# Altium PCB Main.PcbDoc
Units mm, origin at the board's own origin, x right, y up, seen from the top; angles counter-clockwise.
Board outline 22.5 x 80 mm, 2 copper layers (Top Layer, Bottom Layer), stack 1.569 mm thick; 43 components, 44 nets, 212 pads, 109 vias.
Unrouted connection lines stored in the file: 3.
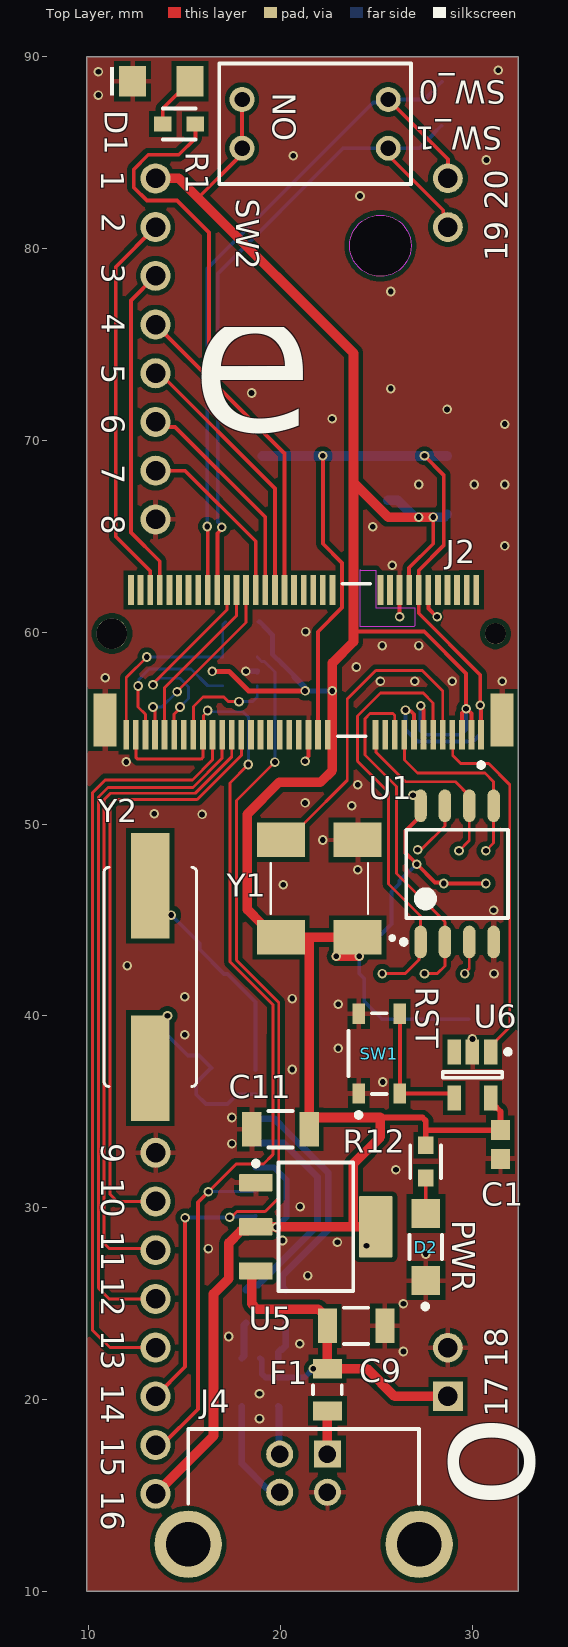
[diagram p0: Top Layer view]
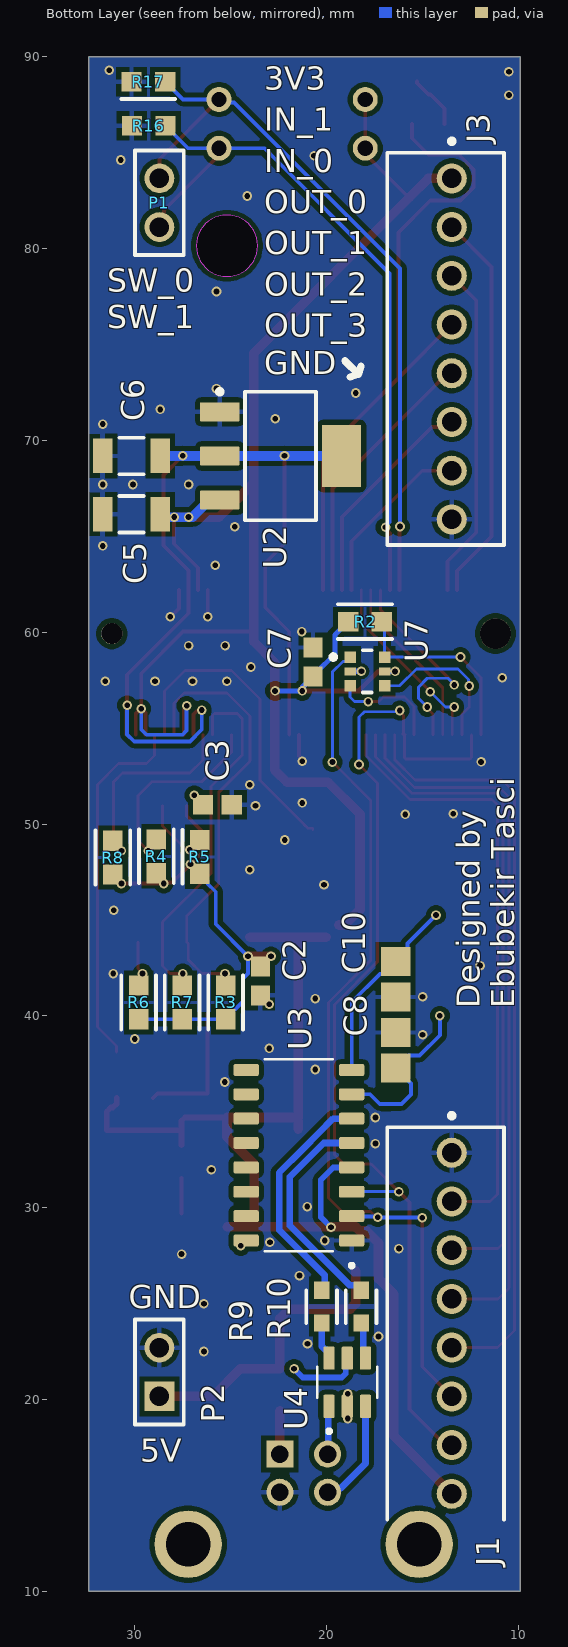
[diagram p1: Bottom Layer view, seen from below]
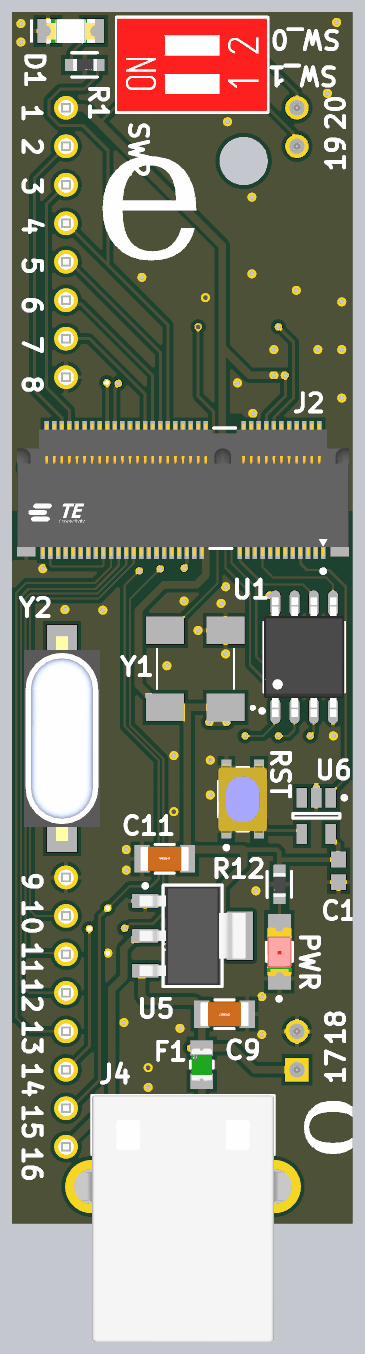
[diagram p2: 3D render of the assembled board from above, using the file's embedded part models]
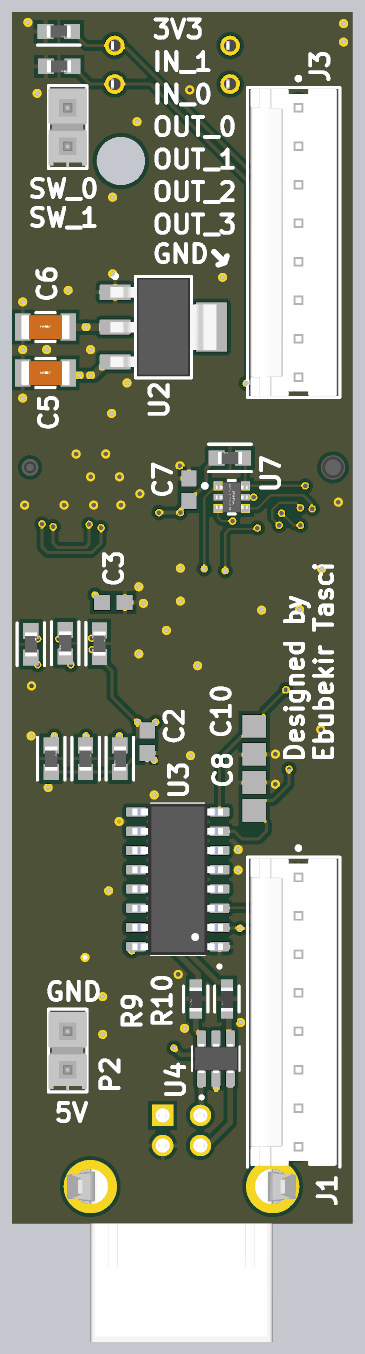
[diagram p3: 3D render of the assembled board from below, using the file's embedded part models]

## Layer stack, top to bottom
Top Solder: solder mask 0.0254, SM-001, Dk 4
Top Layer: signal copper 0.035
Dielectric 1: core 1.4986, Core-043, Dk 4.3
Bottom Layer: signal copper 0.035
Bottom Solder: solder mask 0.0254, SM-001, Dk 4

## Board outline
9.9,10 32.4,10 32.4,90 9.9,90
cut-out: 25.2,78.55 cw(c25.2,80.15) 23.6,80.15 cw(c25.2,80.15) 25.2,81.75 cw(c25.2,80.15) 26.8,80.15 cw(c25.2,80.15)

## Design rules (kind name [scope] priority, off if disabled: settings)
Clearance [All] p1: gap=0.254 ignorepadtopadclearanceinfootprint=TRUE except(0.15: Arc-Arc Arc-Track Track-Track; 0.2: Arc-SMDPad Arc-Via Arc-Hole Track-SMDPad Track-Via Track-Hole SMDPad-SMDPad)
DiffPairsRouting [All] p1: maxlimit=0.25 minlimit=0.2 mostfreqgap=0.2 toplayer_minwidth=0.25 toplayer_maxwidth=0.35 toplayer_prefwidth=0.25 bottomlayer_minwidth=0.25 bottomlayer_maxwidth=0.35 bottomlayer_prefwidth=0.25 maxuncoupledlength=5
MinimumSolderMaskSliver [All] p1: minsoldermaskwidth=0.1
PlaneConnect [All] p1: pad.planeconnectstyle=Relief pad.reliefexpansion=0.508 pad.reliefentries=4 pad.reliefconductorwidth=0.254 pad.reliefairgap=0.254 via.planeconnectstyle=Direct via.reliefexpansion=0.508 via.reliefentries=4 via.reliefconductorwidth=0.254 via.reliefairgap=0.254
PolygonConnect [All] p1: thpad.connectstyle=Relief thpad.reliefconductorwidth=0.254 thpad.reliefentries=4 thpad.polygonreliefangle="90 Angle" thpad.airgapwidth=0.254 smdpad.connectstyle=Relief smdpad.reliefconductorwidth=0.254 smdpad.reliefentries=4 smdpad.polygonreliefangle="90 Angle" smdpad.airgapwidth=0.254 via.connectstyle=Direct via.reliefconductorwidth=0.254 via.reliefentries=4 via.polygonreliefangle="90 Angle" via.airgapwidth=0.254
RoutingVias [All] p1: holewidth=0.711 width=1.27 viastyle="Through Hole" minholewidth=0.711 minwidth=1.27 maxholewidth=0.711 maxwidth=1.27
SilkToSolderMaskClearance [IsPad] p1: minsilkscreentomaskgap=0.2 clearancetoexposedcopper=TRUE
SolderMaskExpansion [All] p1: expansion=0.05 istentingtop=FALSE
SupplyNets "Schematic Supply Nets_3" [InNet('+5V_USB')] p1: voltage=0.000
SupplyNets "Schematic Supply Nets_2" [InNet('GND')] p2: voltage=0.000
SupplyNets "Schematic Supply Nets_1" [InNet('+3.3V')] p3: voltage=0.000
SupplyNets "Schematic Supply Nets" [InNet('+1.8V')] p4: voltage=0.000
Width [All] p1: maxlimit=2 minlimit=0.15 preferedwidth=0.2 minimp=50.000000 maximp=50.000000 favimp=50.000000
26 further rules are at their usual default settings.

## Classes and differential pairs
differential pair USB_1: +USB_1_P -USB_1_N
differential pair USB_2: +USB_2_P -USB_2_N

## Components (designator, comment, footprint, x,y, rotation, side; value= is the part's Value field where it differs from the comment)
C1 "100nF 0603" CAPC1608X90X35NL15T15 31.46,33.29 r90 top
C2 "100nF 0603" CAPC1608X90X35NL15T15 23.458,41.817 r90 bottom
C3 "100nF 0603" CAPC1608X90X35NL15T15 25.7,51 r0 bottom
C5 "10uF 1206" FP-CC1206-FD-MFG 30.179,66.15 r180 bottom
C6 "10uF 1206" FP-CC1206-FD-MFG 30.179,69.187 r180 bottom
C7 "100nF 0603" CAPC1608X90X35NL15T15 20.712,58.449 r270 bottom
C8 "22pF 0805" CAPC2013X145X48ML20T23 16.4,38.204 r90 bottom
C9 "10uF 1206" FP-CC1206-FD-MFG 23.937,23.833 r180 top
C10 "22pF 0805" CAPC2013X145X48ML20T23 16.4,41.908 r270 bottom
C11 "10uF 1206" FP-CC1206-FD-MFG 19.989,34.089 r0 top
D1 "LED 1206 AMBER" WL-SMCW_1206_150120xx75000 13.783,88.725 r0 top
D2 "LED 1206 RED" FP-LTST-C150KRKT-MFG 27.566,27.945 r90 top
F1 "FSMD020-0805-R" FP-0805L-MFG 22.437,20.504 r90 top value=0.15-0.85Ω
J1 "640456-8" FP-640456-8-MFG 13.797,23.97 r90 bottom
J2 "2199230-4" FP-2199230-4-MFG 21.2,58.55 r180 top
J3 "640456-8" FP-640456-8-MFG 13.797,74.77 r90 bottom
J4 "897-43-004-90-000000" FP-897-43-004-90-000000-MFG 21.2,10.3 r0 top
P1 "TSW-102-26-L-S" SMTC-TSW-102-26-XX-S#1 28.72,81.12 r90 bottom
P2 "TSW-102-26-L-S" SMTC-TSW-102-26-XX-S#2 28.72,20.16 r90 bottom
R1 "100R 0603" FP-RT0603-MFG 14.703,86.496 r0 top value=100Ω
R2 "10k 0603" FP-AC0603-IPC_A 18.002,60.547 r0 bottom
R3 "10k 0603" FP-AC0603-IPC_A 25.268,40.7 r270 bottom
R4 "10k 0603" FP-AC0603-IPC_A 28.877,48.316 r270 bottom
R5 "10k 0603" FP-AC0603-IPC_A 26.61,48.29 r90 bottom
R6 "10k 0603" FP-AC0603-IPC_A 29.8,40.7 r90 bottom
R7 "10k 0603" FP-AC0603-IPC_A 27.534,40.7 r90 bottom
R8 "10k 0603" FP-AC0603-IPC_A 31.143,48.248 r90 bottom
R9 "100R 0603" FP-RT0603-MFG 20.261,24.837 r270 bottom value=100Ω
R10 "100R 0603" FP-RT0603-MFG 18.2,24.837 r270 bottom value=100Ω
R12 "100R 0603" FP-RT0603-MFG 27.566,32.399 r270 top value=100Ω
R16 "10k 0603" FP-AC0603-IPC_A 29.277,86.4 r180 bottom
R17 "10k 0603" FP-AC0603-IPC_A 29.3,88.7 r180 bottom
SW1 "PTS810 SJG 250 SMTR LFS" FP-PTS810_SJG_250_SMTR_LF-MFG 25.14,38.03 r90 top
SW2 "418117170902" 418117170902 21.8,86.5 r90 top
U1 "MX25L3233FM2I-08G" MXIC-SOP-8_N 29.2,47.4 r90 top
U2 "TLV1117LV18DCYR" DCY0004A_M 22.4,69.187 r180 bottom
U3 "CH340G" SOIC127P600X180-16N 21.446,32.732 r0 bottom
U4 "USBLC6-2SC6" SOT95P280X145-6N 18.928,20.898 r90 bottom
U5 "TLV1117LV33DCYR" DCY0004A_N 21.834,29 r0 top
U6 "MCP1319MT-33AE/OT" SOT-23-OT5_M 30,36.92 r270 top
U7 "74LVC1G157GW,125" FP-SOT363-MFG 17.883,57.955 r180 bottom
Y1 "ASV-10.000MHZ-E-T" XTAL_ASV-10.000MHZ-E-T 22.016,46.627 r180 top
Y2 "AS-12.000-20-SMD-TR" XTAL1170X500X450 13.207,42.029 r270 top

## Footprints (in the part's own frame and the unit in brackets; to place one, negate y for a bottom-side part, rotate by r counter-clockwise, add the part's x,y. Pads: shape width x height; smd on the part's side, far side on the other; paste and mask are expansions set on the pad)
418117170902 [mm] "2.54 mm compact THT with flat actuator, 2p"
  round 1.3 hole 0.8: 1(-1.27,-3.81) 2(1.27,-3.81) 3(1.27,3.81) 4(-1.27,3.81)
  silkscreen extent -3.14,-5 3.14,5, body extent -3.04,-4.95 3.04,4.95, height 5.75
CAPC1608X90X35NL15T15 [mm] "Chip Capacitor, 2-Leads, Body 1.60x0.81mm, IPC Medium Density"
  rect 1.05x1 smd: 1(-0.75,0) 2(0.75,0)
  body extent -0.88,-0.48 0.87,0.48, height 0.9
CAPC2013X145X48ML20T23 [mm] "Chip Capacitor, 2-Leads, Body 2.00x1.25mm, IPC Low Density"
  rect 1.5x1.55 smd: 1(-0.925,0) 2(0.925,0)
  body extent -1.1,-0.72 1.1,0.72, height 1.45
DCY0004A_M [mm] "SOT223, 4-Leads, Body 6.7x3.7mm, Pitch 2.3mm, IPC Low Density"
  rrect10% 2.05x1 smd: 1(-3.175,2.3) 2(-3.175,0) 3(-3.175,-2.3)
  rrect5% 2.05x3.25 smd: 4(3.175,0)
  silkscreen extent -3.3,-3.35 1.85,3.47, body extent -3.5,-3.25 3.5,3.25, height 1.62
DCY0004A_N [mm] "SOT223, 4-Leads, Body 6.7x3.7mm, Pitch 2.3mm, IPC Medium Density"
  rrect11% 1.75x0.9 smd: 1(-3.125,2.3) 2(-3.125,0) 3(-3.125,-2.3)
  rrect6% 1.75x3.2 smd: 4(3.125,0)
  silkscreen extent -3.25,-3.35 1.95,3.42, body extent -3.5,-3.25 3.5,3.25, height 1.62
FP-0805L-MFG [mm]
  rect 1x1.5 smd paste+0 mask+0: 1(-1.1,0) 2(1.1,0)
  silkscreen extent -0.23,-0.75 0.23,0.75, body extent -1.05,-0.67 1.05,0.67, height 1.25
FP-897-43-004-90-000000-MFG [mm]
  rect 1.41x1.41 hole 0.91 paste-2539.97 mask+0: 1(1.24,6.85)
  round 1.41 hole 0.91 paste-2539.97 mask+0: 2(-1.25,6.85) 3(-1.25,4.86) 4(1.24,4.86)
  round 3.51 hole 2.31 paste-2539.97 mask+0: 5(-6.02,2.15) 6(6.02,2.15)
  silkscreen extent -6.02,4.28 6.02,8.15, body extent -7.88,-8.25 7.88,8.25, height 0.25
FP-640456-8-MFG [mil]
  round 61.65 hole 40 paste-99999 mask+0: 1(350,-12.5) 2(250,-12.5) 3(150,-12.5) 4(50,-12.5) 5(-50,-12.5) 6(-150,-12.5) 7(-250,-12.5) 8(-350,-12.5)
  silkscreen extent -403,-120 431,120, body extent -400,-113 400,113, height 415
FP-2199230-4-MFG [mm]
  rect 0.3x1.55 smd paste+0 mask+0: 1(-9.25,3.9) 2(-9,-3.65) 3(-8.75,3.9) 4(-8.5,-3.65) 5(-8.25,3.9) 6(-8,-3.65) 7(-7.75,3.9) 8(-7.5,-3.65) 9(-7.25,3.9) 10(-7,-3.65) 11(-6.75,3.9) 12(-6.5,-3.65) 13(-6.25,3.9) 14(-6,-3.65) 15(-5.75,3.9) 16(-5.5,-3.65) 17(-5.25,3.9) 18(-5,-3.65) 19(-4.75,3.9) 20(-4.5,-3.65) 21(-4.25,3.9) 22(-4,-3.65) 23(-3.75,3.9) 32(-1.5,-3.65) 33(-1.25,3.9) 34(-1,-3.65) 35(-0.75,3.9) 36(-0.5,-3.65) 37(-0.25,3.9) 38(0,-3.65) 39(0.25,3.9) 40(0.5,-3.65) 41(0.75,3.9) 42(1,-3.65) 43(1.25,3.9) 44(1.5,-3.65) 45(1.75,3.9) 46(2,-3.65) 47(2.25,3.9) 48(2.5,-3.65) 49(2.75,3.9) 50(3,-3.65) 51(3.25,3.9) 52(3.5,-3.65) 53(3.75,3.9) 54(4,-3.65) 55(4.25,3.9) 56(4.5,-3.65) 57(4.75,3.9) 58(5,-3.65) 59(5.25,3.9) 60(5.5,-3.65) 61(5.75,3.9) 62(6,-3.65) 63(6.25,3.9) 64(6.5,-3.65) 65(6.75,3.9) 66(7,-3.65) 67(7.25,3.9) 68(7.5,-3.65) 69(7.75,3.9) 70(8,-3.65) 71(8.25,3.9) 72(8.5,-3.65) 73(8.75,3.9) 74(9,-3.65) 75(9.25,3.9)
  rect 1.2x2.75 smd paste+0 mask+0: 76(-10.35,3.125) 77(10.35,3.125)
  round 1.1 hole 1.1 unplated paste-2539.97 mask+0: ""(-10,-1.375)
  round 1.6 hole 1.6 unplated paste-2539.97 mask+0: ""(10,-1.375)
  silkscreen extent -9.38,-3.98 -1.78,5.6, body extent -11.1,-4.52 11.1,4.77, height 0.25
FP-AC0603-IPC_A [mm]
  rect 1.059x1.012 smd paste+0 mask+0: 1(-0.877,0) 2(0.877,0)
  silkscreen extent -1.41,-0.91 1.41,0.91, body extent -0.8,-0.4 0.8,0.4, height 0.55
FP-CC1206-FD-MFG [mm]
  rect 1x1.8 smd paste+0 mask+0: 1(-1.5,0) 2(1.5,0)
  silkscreen extent -0.63,-0.95 0.63,0.95, body extent -1.6,-0.8 1.6,0.8, height 1.9
FP-LTST-C150KRKT-MFG [mm]
  rect 1.5x1.5 smd paste+0 mask+0: 1(-1.75,0) 2(1.75,0)
  silkscreen extent -3.22,-0.85 0.63,0.85, body extent -2.6,-0.95 2.6,0.95, height 0.25
FP-PTS810_SJG_250_SMTR_LF-MFG [mm]
  rect 1.05x0.65 smd paste+0 mask+0: 1(-2.075,1.075) 2(2.075,1.075) 3(-2.075,-1.075) 4(2.075,-1.075)
  silkscreen extent -3.32,-0.38 2.1,1.6, body extent -2.7,-1.7 2.7,1.7, height 0.25
FP-RT0603-MFG [mm]
  rect 0.9x0.8 smd paste+0 mask+0: 1(-0.85,0) 2(0.85,0)
  silkscreen extent -0.85,-0.81 0.86,0.8, body extent -1.4,-0.55 1.4,0.55, height 0.25
FP-SOT363-MFG [mm]
  rect 0.6x0.6 smd paste-1000 mask+0: 1(-0.9,0.75) 3(-0.9,-0.75) 4(0.9,-0.75) 6(0.9,0.75)
  rect 0.6x0.4 smd paste+0 mask+0: 2(-0.9,0) 5(0.9,0)
  silkscreen extent -1.9,-1.1 0.23,1.1, body extent -1.05,-1 1.05,1, height 1.1
MXIC-SOP-8_N [mm] "SOP, 8-Leads, Body 5.4x5.3mm, Pitch 1.27mm, IPC Medium Density"
  oval 1.7x0.65 smd: 1(-3.55,1.905) 2(-3.55,0.635) 3(-3.55,-0.635) 4(-3.55,-1.905) 5(3.55,-1.905) 6(3.55,-0.635) 7(3.55,0.635) 8(3.55,1.905)
  silkscreen extent -3.67,-2.65 2.3,2.9, body extent -3.95,-2.65 3.95,2.65, height 2.16
SMTC-TSW-102-26-XX-S#1 [mm] ".025 SQ Post Terminal Strip Assembly, 1x2 Pins, Vertical, 2.54mm Pitch, Male"
  round 1.55 hole 1.02: 1(0,0) 2(2.54,0)
  silkscreen extent -1.46,-1.27 4,1.27, body extent -1.4,-1.27 3.81,1.27, height 8.38
SMTC-TSW-102-26-XX-S#2 [mm] ".025 SQ Post Terminal Strip Assembly, 1x2 Pins, Vertical, 2.54mm Pitch, Male"
  rect 1.55x1.55 hole 1.02: 1(0,0)
  round 1.55 hole 1.02: 2(2.54,0)
  silkscreen extent -1.46,-1.27 4,1.27, body extent -1.4,-1.27 3.81,1.27, height 8.38
SOIC127P600X180-16N [mm]
  rrect25% 1.31x0.62 smd: 1(-2.75,4.445) 2(-2.75,3.175) 3(-2.75,1.905) 4(-2.75,0.635) 5(-2.75,-0.635) 6(-2.75,-1.905) 7(-2.75,-3.175) 8(-2.75,-4.445) 9(2.75,-4.445) 10(2.75,-3.175) 11(2.75,-1.905) 12(2.75,-0.635) 13(2.75,0.635) 14(2.75,1.905) 15(2.75,3.175) 16(2.75,4.445)
  silkscreen extent -2.85,-5 1.78,5.85, body extent -3,-5 3,5, height 1.8
SOT95P280X145-6N [mm]
  rrect25% 1.21x0.59 smd: 1(-1.255,0.95) 2(-1.255,0) 3(-1.255,-0.95) 4(1.255,-0.95) 5(1.255,0) 6(1.255,0.95)
  silkscreen extent -2.65,-1.57 0.81,1.57, body extent -1.4,-1.46 1.4,1.46, height 0.4
SOT-23-OT5_M [mm] "SOT23, 5-Leads, Body 2.9x1.7mm, Pitch 0.95mm, Lead Span 2.8mm, IPC Low Density"
  rect 1.3x0.7 smd: 1(-1.2,0.95) 2(-1.2,0) 3(-1.2,-0.95) 4(1.2,-0.95) 5(1.2,0.95)
  silkscreen extent -1.32,-1.55 0.15,1.98, body extent -0.9,-1.55 0.9,1.55, height 1.45
WL-SMCW_1206_150120xx75000 [mm] "SMD Mono-color Chip LED, body 3.2x1.6mm"
  rect 1.4x1.6 smd: 1(-1.5,0) 2(1.5,0)
  silkscreen extent -2.68,-0.75 -2.48,0.75, body extent -1.6,-0.8 1.6,0.8, height 0.68
XTAL1170X500X450 [mm]
  rect 5.5x2 smd: 1(-4.75,0) 2(4.75,0)
  silkscreen extent -5.72,-2.41 5.72,2.41, body extent -6.75,-2.5 6.75,2.5, height 4.5
XTAL_ASV-10.000MHZ-E-T [mm]
  rect 2.5x1.8 smd: 1(-2,2.54) 2(-2,-2.54) 3(2,-2.54) 4(2,2.54)
  silkscreen extent -3.89,-1.32 2.54,2.67

## Part data
C1 C2 C3 C7: library part CMP-2006-02299-1, Manufacturer=Kemet, Part Number=C0603C104K4RAC7013
C5 C6 C9 C11: library part CMP-03422-001420-1, "CAP CER 10UF 50V X5R 1206 / CC1206KKX5R9BB106", Capacitance=10uF, Case/Package=1206, Dielectric=X5R, Max Operating Temperature=85°C, Min Operating Temperature=-55°C, Tolerance=10%, Voltage Rating=50V, Halogen Free="Halogen Free", Lead Free="Lead Free", Length=0.126inch, Mount="Surface Mount", Packaging="Tape and Reel", RoHS Compliant=Yes, Thickness=0.075inch, Voltage Rating (DC)=50V, Width=0.063inch
C8 C10: library part CMP-2007-01710-1, Manufacturer=Vitramon, Part Number=VJ0805A220KXAMC
D1: library part CMP-1426-00018-5, "Led, 1206, Amber, 140Mcd, 605Nm;", Case Code (Imperial)=1206, Case Code (Metric)=3216, Color=Orange, Forward Current=100mA, Forward Voltage=2V, Manufacturer Lifecycle Status=ACTIVE, Max Operating Temperature=85°C, Max Reverse Voltage (DC)=5V, Min Operating Temperature=-40°C, Test Current=20mA, Case/Package=1206, Dominant Wavelength=605nm, Height=680µm, Length=3.2mm, Lens Style="Clear, Rectangular", Lifecycle Status=Production, Luminous Intensity=140mcd, Mount="Surface Mount", Packaging="Tape and Reel", Peak Wavelength=610nm, REACH SVHC=Unknown, RoHS=Compliant, Viewing Angle=140°, Wavelength=605nm, Width=1.6mm, YEOL="1 = Estimated lifetime > 10 years"
D2: library part CMP-2000-06617-2, "LED RED CLEAR 1206 SMD / LTST-C150KRKT", Case Code (Imperial)=1206, Case Code (Metric)=3216, Color=Red, Forward Current=30mA, Forward Voltage=2V, Lens Color=Colorless, Max Operating Temperature=85°C, Min Operating Temperature=-30°C, Package Quantity=1, Power Dissipation=62.5mW, Power Rating=75mW, Reverse Voltage=5V, Test Current=20mA, Case/Package=1206, Depth=1.6mm, Dominant Wavelength=631nm, Height=1.1mm, Illumination Color=Red, Lead Free="Lead Free", Length=3.2mm, Lens Style=Diffused, Lens Transparency=Clear, Luminous Intensity=54mcd, Mount="Surface Mount", Number of Elements=1, Number of LEDs=1, Number of Pins=2, Packaging="Tape and Reel", Radiation Hardening=No, Viewing Angle=130°, Wavelength=639nm, Width=1.6mm
F1: library part CMP-08606-000023-1, "PTC RESET FUSE 9V 200MA 0805", Ambient Temperature Range High=+85°C, Ambient Temperature Range Low=-40°C, Hold Current=0.2A, Manufacturer="Littelfuse Inc.", Manufacturer Part Number=0805L050WR, Package=0805L, Resistance=0.15-0.85Ω, Temperature="-40°C to +85°C", Trip Current=1A, Voltage Rating=6V, Automotive=No, Category=Fuse, Device Class L1="Circuit Protection", Device Class L2="PTC Resettable Fuses", Device Class L3=unset, Digikey Description="PTC RESET FUSE 6V 500MA 0805", Height=1.25mm, Lead Free=Yes, Octopart=https://octopart.com/0805l050wr-littelfuse-673858, RoHS=TRUE, Temperature Range High=+85°C, Temperature Range Low=-40°C, Trip Time=0.1s
J1 J3: library part CMP-03369-000098-1, "CONN HEADER VERT 8POS 2.54MM", RoHS Compliant=Yes
J2: library part CMP-03365-000002-1, "CONN FEMALE 67POS 0.020 GOLD", Current Rating=0.5A, Manufacturer="TE Connectivity", Package=0, Temperature="-40°C to +80°C", Temperature Range High=+80°C, Temperature Range Low=-40°C, Voltage Rating=50V, Automotive=No, Category=Conn, ComponentLink2Description=Datasheet, ComponentLink2URL=https://www.te.com/commerce/DocumentDelivery/DDEController?Action=showdoc&DocId=Customer+Drawing%7F2199230%7FB3%7Fpdf%7FEnglish%7FENG_CD_2199230_B3.pdf%7F2199230-4, Conn Gender=Female, Conn Orientation="Right Angle", Contact Material=Gold,Nickel, Device Class L1=Connectors, Device Class L2="Card Edge Connectors", Device Class L3=unset, Digikey Description="CONN FEMALE 67POS 0.020 GOLD", Height=4.2mm, Is Female=yes, Lead Free=Yes, Manufacturer Part Number=2199230-4, Mouser Description="PCI Express / PCI Connectors .5PITCH 4.2H KEY E EMBOSS NGFF MINICARD", Number Of Contacts=67, Number of Rows=2, Octopart=https://octopart.com/2199230-4-te+connectivity-46436156, Pitch=0.5mm, RoHS=TRUE
J4: library part CMP-07782-000001-1, "CONN RCPT USB2.0 TYPEB 4POS R/A", Flammability Rating="UL94 V-0", Insulation Resistance=1GR, Max Current Rating=1A, Max Voltage Rating (AC)=30V, Package Quantity=150, Connector Type=USB, Contact Material="Copper Alloy", Contact Plating=Gold, Depth=16mm, Gender=Receptacle, Housing Material=Thermoplastic, Lead Free="Lead Free", Length=12.03mm, Mount="Through Hole", Number Of Contacts=4, Number of Ports=1, Number of Positions=4, Number of Terminals=4, Orientation="Right Angle", Packaging=Tray, REACH SVHC="No SVHC", Termination="Through Hole", USB Standard="USB 2.0"
P1 P2: library part CMP-1024-00330-1, "0.025\" SQ Post Header, Through-hole, Vertical, -55 to 125 degC, 2.54 mm Pitch, 2-Pin, Male, RoHS", Manufacturer=Samtec, Temperature Range="-55 to 125 degC", ComponentLink1Description="Manufacturer URL", ComponentLink1URL=http://www.samtec.com, ComponentLink2Description=Datasheet, ComponentLink2URL=http://www.samtec.com/documents/webfiles/pdf/TSW_TH.PDF, ComponentLink3Description="Package Specification", ComponentLink3URL=http://www.samtec.com/documents/webfiles/cpdf/TSW-XXX-XX-XXX-X-XX-XXX-MKT.pdf, DatasheetVersion=F-214, Mounting Technology=Through-hole, Orientation=Vertical, PackageDescription=".025[0.64] SQ. Post Terminal Strip Assembly", PackageReference=TSW-102-26-XX-S, PackageVersion="DM, 8/1988", PartNumber=TSW-102-26-L-S, Pitch="2.54 mm", RoHS=True
R1 R9 R10 R12: library part CMP-03412-003691-1, "Res Thin Film 0603 100 Ohm 0.1% 1/10W ±10ppm/°C Molded SMD Paper T/R", Manufacturer=Yageo, Manufacturer Part Number=RT0603BRB07100RL, Package=RT0603, Power Rating=0.1W, Resistance=100Ω, Temperature="-55°C to +155°C", Temperature Coefficient="10 ppm/°C", Temperature Range High=+155°C, Temperature Range Low=-55°C, Tolerance=0.001, Voltage Rating=75V, Automotive=No, Category=Res, ComponentLink2Description=Datasheet, ComponentLink2URL=http://www.yageo.com/documents/recent/PYu-RT_1-to-0.01_RoHS_L_9.pdf, Composition="Thin Film", Device Class L1="Passive Components", Device Class L2=Resistors, Device Class L3="Chip SMD Resistors", Digikey Description="Res Thin Film 0603 100 Ohm 0.1% 1/10W ±10ppm/°C Molded SMD Paper T/R", Footprint Url=http://www.yageo.com/exep/pages/download/literatures/PYu-R_Mount_10.pdf, Height=0.55mm, Ipc Land Pattern Name=RESC16080X45, Lead Free=Yes, Mouser Description="Thin Film Resistors 1/10W 100 ohm .1% 10ppm", Octopart=https://octopart.com/rt0603brb07100rl-yageo-30314052, RoHS=TRUE, Series=RT
R2 R3 R4 R5 R6 R7 R8 R16 R17: library part CMP-03412-040683-1, "RES 10kΩ 5.00% 0.2W 0603"
SW1: library part CMP-10040-000011-1, "SWITCH TACTILE SPST-NO 0.05A 16V", Contact Resistance=500mΩ, Current Rating=50mA, Manufacturer="C&K Components", Operating Force=400gf, Temperature="-40°C to +85°C", Temperature Range High=+85°C, Temperature Range Low=-40°C, Voltage Rating Dc=16V, Automotive=No, Category=Switch, ComponentLink2Description=Datasheet, ComponentLink2URL=https://www.ckswitches.com/media/1476/pts810.pdf, Device Class L1=Electromechanical, Device Class L2=Switches, Device Class L3="Tactile Switches", Digikey Description="SWITCH TACTILE SPST-NO 0.05A 16V", Electromechanical Life=100000Cycles, Height=2.7mm, Lead Free=Yes, Manufacturer Part Number="PTS810 SJG 250 SMTR LFS", Mouser Description="Switch Tactile N.O. SPST Button J-Bend 0.05A 16VDC 100000Cycles 3.92N SMD T/R", Octopart=https://octopart.com/pts810sjg250smtrlfs-c%26k+components-29380277, Package="PTS810 SJG 250 SMTR LFS", RoHS=TRUE, Throw Configuration=SPST-NO
SW2: library part CMP-1434-00002-4, "Dip Switch, 0.025A, 24Vdc, 2 Pos, Tht Rohs Compliant: Yes", Current Rating=25mA, Insulation Resistance=100MΩ, Manufacturer Lifecycle Status=ACTIVE, Max Operating Temperature=85°C, Min Operating Temperature=-40°C, Voltage Rating=24V, Body Material="PBT, Polybutylene", Contact Plating=Gold, Electrical Life=2kcycles, Length=6.08mm, Lifecycle Status=Production, Mechanical Life=2kcycles, Number of Positions=2, Pitch=2.54mm, RoHS=Compliant, Termination="PC Pin", Throw Configuration=SPST, Voltage Rating (DC)=24V, Washable=No, YEOL="1 = Estimated lifetime > 10 years"
U1: library part CMP-2000-05278-1, "CMOS MXSMIO(R) (Serial Multi I/O) Flash Memory, 32 Mbits (x1/x2/x4), 3 V, -40 to 85 degC, 8-Pin SOP", Manufacturer=Macronix, Package Description="8-Pin Small Outline Package, Body 5.23 x 5.28 mm, Pitch 1.27 mm", Package Reference=SOP-8, Datasheet URL=http://datasheet.octopart.com/MX25L3233FM2I-08G-Macronix-datasheet-38883555.pdf, Datasheet Version="Rev. 1.1, 01/2015", Manufacturer URL=http://www.macronix.com
U2: library part CMP-0395-00524-2, "Single Output LDO, 1 A, Fixed 1.8 V Output, 2 to 5.5 V Input, 4-pin SOT-223 (DCY), -40 to 125 degC, Green (RoHS & no Sb/Br)", Manufacturer="Texas Instruments", Accuracy(%)=2, Code_JEDEC=TO-261, ComponentLink1Description="Manufacturer URL", ComponentLink1URL=http://www.ti.com/, ComponentLink2Description=Datasheet, ComponentLink2URL=http://www.ti.com/general/docs/lit/getliterature.tsp?genericPartNumber=TLV1117LV18&fileType=pdf, ComponentLink3Description="Package Specification", ComponentLink3URL=http://www.ti.com/litv/pdf/mpds094a, DatasheetVersion=SBVS160A, Eco-Plan="Green (RoHS & no Sb/Br)", Fixed Output Options(V)=1.8, Iout(Max)(A)=1, Iq(Typ)(mA)=0.05, Mounting Technology="Surface Mount", PackageDescription="4-Pin Plastic Small Outline, Body 3.5 x 6.5 mm, Pitch 2.3 mm", PackageReference=DCY0004A, PackageVersion=4202506/B, PartNumber=TLV1117LV18DCYR, SubFamily="Single Channel LDO", Vdo(Typ)(mV)=1200, Vin(Max)(V)=5.5, Vin(Min)(V)=2, Vout Adj(Max)(V)=1.8, Vout Adj(Min)(V)=1.8
U3: library part CMP-064-000000-1, "USB Interface Integrated Circuit", Package=None, Availability="Not in stock", Check_prices=https://www.snapeda.com/parts/Ch340G/WCH/view-part/?ref=eda, Component Type=Standard, Design Item ID=CH340G, MF=WCH, MP=Ch340G, Pin Count=16, Price=None, SnapEDA_Link=https://www.snapeda.com/parts/Ch340G/WCH/view-part/?ref=snap, Source=CH340G.SchLib
U4: library part CMP-004-00031-1, "17V Clamp 5A (8/20Âµs) Ipp Tvs Diode Surface Mount SOT-23-6", Case/Package="SOT-23-6 STMicroelectronics", Availability="In Stock", Check_prices=https://www.snapeda.com/parts/USBLC6-2SC6/STMicroelectronics/view-part/?ref=eda, Component Type=Standard, Design Item ID=USBLC6-2SC6, MF=STMicroelectronics, MP=USBLC6-2SC6, Pins=6, Price=None, Purchase-URL=https://pricing.snapeda.com/search/part/USBLC6-2SC6/?ref=eda, SnapEDA_Link=https://www.snapeda.com/parts/USBLC6-2SC6/STMicroelectronics/view-part/?ref=snap, Source=USBLC6-2SC6.SchLib
U5: library part CMP-0395-00503-2, "Single Output LDO, 1 A, Fixed 3.3 V Output, 2 to 5.5 V Input, 4-pin SOT-223 (DCY), -40 to 125 degC, Green (RoHS & no Sb/Br)", Manufacturer="Texas Instruments", Accuracy(%)=2, Code_JEDEC=TO-261, ComponentLink1Description="Manufacturer URL", ComponentLink1URL=http://www.ti.com/, ComponentLink2Description=Datasheet, ComponentLink2URL=http://www.ti.com/general/docs/lit/getliterature.tsp?genericPartNumber=TLV1117LV33&fileType=pdf, ComponentLink3Description="Package Specification", ComponentLink3URL=http://www.ti.com/litv/pdf/mpds094a, DatasheetVersion=SBVS160A, Eco-Plan="Green (RoHS & no Sb/Br)", Fixed Output Options(V)=3.3, Iout(Max)(A)=1, Iq(Typ)(mA)=0.05, Mounting Technology="Surface Mount", PackageDescription="4-Pin Plastic Small Outline, Body 3.5 x 6.5 mm, Pitch 2.3 mm", PackageReference=DCY0004A, PackageVersion=4202506/B, PartNumber=TLV1117LV33DCYR, SubFamily="Single Channel LDO", Vdo(Typ)(mV)=1200, Vin(Max)(V)=5.5, Vin(Min)(V)=2, Vout Adj(Max)(V)=3.3, Vout Adj(Min)(V)=3.3
U6: library part CMP-0138-00181-1, "Voltage Supervisor, 5-Pin SOT-23, Extended Temperature, Tape and Reel", Code_IPC=SOT23-5, DatasheetVersion="revB, Oct-2007", PackageDescription="5-Lead Plastic Small Outline Transistor (OT) [SOT-23]", PackageReference=SOT-23-OT5, PackageVersion="revBB, Aug-2009"
U7: library part CMP-14348-000001-1, "IC SINGLE 2-INPUT MUX 6TSSOP", Ambient Temperature Range High=+125°C, Ambient Temperature Range Low=-40°C, Manufacturer=Nexperia, Max Supply Voltage=5.5V, Min Supply Voltage=1.65V, Nominal Supply Current=0.1uA, Package=SOT363, Temperature="-40°C to +125°C", Automotive=No, Category=IC, ComponentLink2Description=Datasheet, ComponentLink2URL=https://assets.nexperia.com/documents/data-sheet/74LVC1G157.pdf, Device Class L1="Integrated Circuits (ICs)", Device Class L2="Logic ICs", Device Class L3=Multiplexers, Digikey Description="IC SINGLE 2-INPUT MUX 6TSSOP", Footprint Url=https://assets.nexperia.com/documents/outline-drawing/SOT363.pdf, Height=1.1mm, Lead Free=Yes, Logic Function Desc=Non-inverting, Manufacturer Part Number=74LVC1G157GW,125, Mouser Description="74LVC Series 3.3 V Surface Mount Single 2-Input Multiplexer - SC-88", Number Of Circuits=1, Number Of Inputs=2, Number Of Outputs=1, Octopart=https://octopart.com/74lvc1g157gw%2C125-nexperia-78736121, Propagation Delay=2.2ns, RoHS=TRUE, Temperature Range High=+125°C, Temperature Range Low=-40°C
Y1: library part CMP-033-000000-1, Package=None, Availability=Unavailable, Component Type=Standard, Design Item ID=ASV-10.000MHZ-E-T, MP=ASV-10.000MHZ-E-T, Pin Count=4, Price=None, Source=ASV-10.000MHZ-E-T.SchLib
Y2: library part CMP-003-00030-1, "CRYSTAL, 12MHz, 20PF, SMD; Frequency:12MHz; Frequency Tolerance:Â± 30ppm; Load Capacitance:20pF; Operating Temperature Range:-20Â°C to +70Â°C; Crystal Mounting Type:SMD; Crystal Case Type:HC-49S; No. of Pins:2; MSL:MSL 1 - Unlimited", Case/Package="HC49SD Fox Electronics", Check_prices=https://www.snapeda.com/parts/FOXSDLF/120-20/Fox+Electronics/view-part/?ref=eda, Component Type=Standard, Design Item ID=FOXSDLF/120-20, MF="Fox Electronics", MP=FOXSDLF/120-20, Pins=2, SnapEDA_Link=https://www.snapeda.com/parts/FOXSDLF/120-20/Fox+Electronics/view-part/?ref=snap, Source=FOXSDLF_120-20.SchLib

## Via types
v1: diameter 0.5, hole 0.3, Top Layer to Bottom Layer, 109 vias

## Nets (pads, with @x,y where several pads share a name; then routed paths per layer and width w, separated by ;. In a path a pad name is that pad's centre, name@x,y a point inside that pad or via, vN(x,y) a via of type N, cw(c..) or ccw(c..) an arc to the next point about the centre after c; other vN are vias at no path point)
+1.8V: C6.2 J2.1 J2.14 J2.15 J2.35 U2.2 U2.4 | length 50.4
  Top Layer w0.2: J2.35 21.95,60.024 23.204,61.278 23.204,63.609 22.2,64.613 v1(22.2,69.2) ; v1(26.51,55.939) 26.567,55.881 26.794,55.881 26.95,55.725 J2.15 ; v1(27.5,69.2) 28.5,68.2 28.5,64.513 27.2,63.213 J2.14 27.2,60.985 30.403,57.782 v1(30.403,56.187) ; v1@30.401,56.189 30.45,56.14 J2.1
  Bottom Layer w0.2: v1(26.51,55.939) 26.51,54.922 27.132,54.3 30.033,54.3 30.403,54.67 v1(30.403,56.187)
  Bottom Layer w0.5: U2.4@19.055,69.187 22.187,69.187 v1(22.2,69.2) 22.213,69.187 25.745,69.187 27.487,69.187 v1(27.5,69.2) 27.513,69.187 C6.2
+3.3V: C1.2 C2.2 C3.2 C5.2 C7.2 C11.2 J1.8 J2.3 J2.5 J2.13 J2.16 J2.33 J3.1 R2.2 R3.2 R4.2 R5.1 R6.1 R7.1 R8.1 R12.1 SW2.3 SW2.4 U1.8 U2.3 U3.4 U3.16 U5.2 U5.4 U6.5 U7.5 Y1.1 Y1.4 | length 181.1
  Top Layer w0.2: 15.702,82.648 17.99,84.937 SW2.3 ; 22.631,52.8 22.631,52.865 ; 23.8,60.031 27.488,60.031 29.67,57.849 v1@29.67,55.977 ; J2.16 26.7,63.359 27.954,64.613 27.954,65.996 v1(27.95,66) ; U1.8 27.295,50.425 26.51,49.64 26.51,48.49 v1(27.1,47.9) 28.049,46.951 28.449,46.951 v1(28.5,46.9) v1(30.7,46.9) ; v1(27.3,56.159) 27.3,56.119 27.45,55.969 J2.13 ; J2.5 29.45,55.789 v1(29.67,56.009) ; v1@29.73,56.024 29.73,55.977 29.95,55.757 J2.3
  Top Layer w0.254: v1(16.434,57.956) 17.307,57.956 18.323,56.94 v1(21.272,56.94)
  Top Layer w0.3: 25.196,34.7 27.39,34.7 27.566,34.524 27.566,34.04 ; R12.1 27.566,34.04 ; U6.5 30.95,35.42 31.15,35.22 31.255,35.22 31.46,35.015 C1.2 27.566,34.04
  Top Layer w0.5: J1.8 16.5,18.1 16.5,25.5 17.3,26.3 17.3,28.166 17.919,28.785 18.274,28.785 18.489,29 19.721,29 v1@19.763,28.957 ; J3.1 14.69,83.66 15.702,82.648 23.8,74.55 23.8,67.8 ; Y1.4@19.366,44.737 19.016,44.737 19.016,44.784 18.262,45.538 18.262,50.512 19.925,52.175 22.075,52.175 22.698,52.798 22.698,58.398 23.8,59.5 23.8,60.031 23.8,67.8 ; v1(19.777,28.971) 19.806,29 23.781,29 ; Y1.4 21.489,44.087 ; C11.2 C11.2@21.489,34.489 ; v1(22.904,43.1) v1(24.1,43.1) ; Y1.1 21.489,44.087 ; U5.4@25.179,29 23.781,29 ; v1(27.95,66) 25.6,66 23.8,67.8 ; 21.489,44.087 21.489,34.7 25.196,34.7 25.196,33.686 23.781,32.271 23.781,29
  Bottom Layer w0.2: v1(27.1,47.9) 27.074,47.9 26.204,47.03 26.204,46.887 25.783,46.466 25.783,44.783 v1(24.1,43.1) 24.1,42.2 24.36,41.94 24.36,40.754 25.268,39.847 R3.2 R6.1 ; v1(27.3,56.159) 27.3,54.866 27.516,54.65 29.385,54.65 29.67,54.935 v1(29.67,56.009)
  Bottom Layer w0.254: v1(16.434,57.956) U7.5 ; R2.2 18.902,60.547 19.281,60.168 19.281,60.144 19.57,59.855 19.57,58.854 20.076,58.347 20.089,58.347 20.712,57.724 C7.2 ; v1(21.272,56.94) v1(22.69,56.94)
  Bottom Layer w0.3: U3.4 19.655,32.097 20.303,31.449 20.303,29.497 v1(19.777,28.971) ; C7.2@20.712,57.674 21.234,57.152 21.234,56.978 v1(21.272,56.94)
  Bottom Layer w0.5: U2.3 26.1,66.887 26.987,66 28.2,66 C5.2@28.529,66 ; C5.2@28.529,66 C5.2 C5.2@28.529,66
  other v1: 24.48,28.006 26.9,51.5 27.2,66
+5V_USB: C9.2 F1.2 P2.1 U4.5 U5.3 | length 19.3
  Top Layer w0.5: U5.3@18.489,26.71 18.489,24.993 18.782,24.7 21.97,24.7 22.437,24.233 F1.2 24.496,21.604 25.94,20.16 P2.1
  Bottom Layer w0.3: U4.5 19.012,22.069 19.012,21.343 19.211,21.144 21.244,21.144 v1(21.7,21.6)
CH340_RX: J1.7 J2.59 J2.73 U3.3 | length 54.9
  Top Layer w0.15: J2.59@15.986,54.686 15.986,55.654 16.191,55.859 v1(16.191,55.917) ; v1(18.316,53.1) 17.36,52.144 17.36,42.816 19.6,40.576 19.6,39.01 19.595,39.005
  Top Layer w0.16: J2.73 12.45,53.477 12.544,53.383 15.856,53.383 15.95,53.477 J2.59 ; v1(16.234,30.827) 17.679,32.271 19.104,32.271 19.595,32.762 19.595,39.005
  Top Layer w0.2: J1.7 13.82,17.62 15.684,19.484 15.684,30.277 v1(16.234,30.827) ; J2.59 J2.59@15.986,54.686
  Bottom Layer w0.15: v1(16.191,55.917) 16.253,55.855 18.035,55.855 18.316,55.574 v1(18.316,53.1)
  Bottom Layer w0.16: v1(16.234,30.827) 16.257,30.85 18.673,30.85 U3.3
CH340_TX: J1.6 U3.2 U7.1 | length 47
  Top Layer w0.15: v1(17.34,29.501) 17.425,29.501 17.718,29.794 19.194,29.794 19.9,30.5 19.9,40.7 17.7,42.9 17.7,51.23 v1(19.7,53.23)
  Top Layer w0.2: J1.6 15.021,21.701 v1@15.021,29.469
  Bottom Layer w0.15: U7.1 19.008,58.48 19.147,58.48 19.705,57.922 19.705,53.235 v1(19.7,53.23)
  Bottom Layer w0.2: v1(15.02,29.47) 15.035,29.485 17.324,29.485 17.368,29.529 18.667,29.529 U3.2
CLK: J2.9 Y1.3 | length 16.4
  Top Layer w0.15: Y1.3@20.727,49.7 20.727,49.778 20.977,49.778 21.191,49.992 21.191,49.998 23.475,52.282 23.475,56.512 24.963,58 27.387,58 28.45,56.937 J2.9
CS: J1.4 J2.55 | length 37.3
  Top Layer w0.15: J1.4 11.06,25.24 10.5,25.8 10.5,51.4 11,51.9 15.424,51.9 16.95,53.426 J2.55
GND: C1.1 C2.1 C3.1 C5.1 C6.1 C7.1 C8.2 C9.1 C10.2 C11.1 D1.1 D2.1 J1.1 J2.12 J2.18 J2.37 J2.76 J2.77 J3.8 J4.4 P2.2 R16.1 R17.1 SW1.1 SW1.2 U1.4 U2.1 U3.1 U4.2 U5.1 U6.2 U7.2 Y1.2 | length 5
  Top Layer w0.2: v1(21.272,53.272) 21.272,53.353 21.45,53.531 J2.37 ; v1(26.2,60.811) J2.18 ; J2.12 27.7,61.238 28.131,60.807 v1(28.155,60.807)
  Bottom Layer w0.3: v1(18.19,57.97) 18.197,57.963 18.775,57.963 U7.2
  other v1: 18.9,19 18.9,20.3 26.4,22.5 21,22.9 17.3,23.283 26.4,24.987 21.415,26.457 27.566,27.579 16.234,27.864 22.96,28.195 20.095,28.287 21.015,30.053 26.009,31.975 17.458,33.34 17.458,34.7 25.32,36.55 20.6,37.2 23,38.3 30,38.79 15,39.01 23,40.6 20.6,40.9 15,41 31.125,42.2 12.006,42.618 31.1,45.5 20.138,46.83 24.016,47.615 22.191,49.167 15.906,50.499 13.406,50.539 23.712,50.95 21.272,51.1 24.016,52.044 11.95,53.236 25.201,57.437 26.995,57.437 28.95,57.437 31.55,57.437 10.85,57.63 23.949,58.185 25.296,59.303 27.2,59.303 21.3,60.03 25.813,63.488 31.679,64.5 24.796,65.5 27.2,67.7 30.1,67.7 31.679,67.7 31.679,70.848 22.68,71.13 28.679,71.614 18.486,72.47 25.745,72.7 25.746,77.76 24.136,82.741 30.73,84.619 20.656,84.84 10.5,88 10.5,89.22 31.339,89.3
GPIO_IN_0: J2.68 J3.3 | length 17.5
  Top Layer w0.2: J3.3 12.2,77.301 12.2,65.195 13.7,63.695 J2.68
GPIO_IN_1: J2.70 J3.2 | length 20.5
  Top Layer w0.2: J2.70 13.2,63.195 11.4,64.995 11.4,79.04 J3.2
GPIO_OUT_0: J2.42 J3.4 R1.2 | length 34.7
  Top Layer w0.2: J3.4 16.26,73.26 ; R1.2 15.553,85.753 14.688,84.888 13.1,84.888 12.343,84.131 12.343,83.189 13.032,82.5 14.6,82.5 16.26,80.84 16.26,73.26 ; J2.42 20.2,69.32 16.26,73.26
GPIO_OUT_1: J2.44 J3.5 | length 14
  Top Layer w0.2: J3.5 13.7,73.5 19.7,67.5 J2.44
GPIO_OUT_2: J2.46 J3.6 | length 11.6
  Top Layer w0.2: J3.6 13.741,70.699 14.501,70.699 19.2,66 J2.46
GPIO_OUT_3: J2.48 J3.7 | length 9.3
  Top Layer w0.2: J3.7 15.02,68.42 18.7,64.74 J2.48
NetC8_1: C8.1 U3.7 Y2.2 | length 9.3
  Bottom Layer w0.2: v1(14.1,40) 14.1,38.987 15.158,37.929 15.75,37.929 C8.1 16.375,37.279 15.725,36.629 15.725,36.604 15.6,36.479 15.6,35.9 16.1,35.4 16.646,35.4 16.65,35.396 17.15,35.396 17.154,35.4 17.233,35.4 17.741,35.907 U3.7
NetC10_1: C10.1 U3.8 Y2.1 | length 10
  Bottom Layer w0.2: v1(14.3,45.25) 15.785,43.766 15.785,43.448 17.05,42.183 17.226,42.183 18.696,40.713 U3.8
NetD1_2: D1.2 R1.1 | length 2.9
  Top Layer w0.2: R1.1 13.853,87.295 14.583,88.025 14.683,88.025 15.283,88.625 D1.2
NetD2_2: D2.2 R12.2 | length 1.9
  Top Layer w0.2: D2.2 R12.2
NetF1_1: F1.1 J4.1 | length 2.3
  Top Layer w0.5: F1.1 22.44,19.401 J4.1
NetR5_2: R5.2 U1.7 | length 3
  Top Layer w0.15: v1(27.138,48.654) 27.205,48.721 27.386,48.721 28.565,49.9 U1.7
NetR6_2: R6.2 U1.3 | length 1.7
  Top Layer w0.15: v1(29.6,42.2) 29.6,42.228 29.835,42.463 U1.3
NetR9_2: R9.2 U4.6 | length 2
  Bottom Layer w0.35: U4.6 19.878,22.463 19.998,22.583 20.056,22.583 20.261,22.788 R9.2
NetR10_2: R10.2 U4.4 | length 1.9
  Bottom Layer w0.35: U4.4 18.089,22.264 18.089,23.876 R10.2
NetSW1_3: SW1.3 SW1.4 U6.4 | length 7.1
  Top Layer w0.2: SW1.3@26.215,35.945 28.825,35.945 U6.4 ; SW1.3 SW1.4
P11: J2.11 R3.1 U1.1 | length 22.6
  Top Layer w0.15: v1(25.3,42.2) 26.495,42.2 27.219,42.924 27.219,43.774 U1.1 27.295,45.205 25.624,46.876 25.624,51.651 24,53.275 24,55.624 25.201,56.825 27.437,56.825 27.95,56.312 J2.11
P17: J2.17 R8.2 U1.5 | length 10.2
  Top Layer w0.15: J2.17 26.45,53.341 27.138,52.653 30.652,52.653 31.105,52.2 U1.5 31.105,49.005 v1(30.7,48.6)
P19: J2.19 R7.2 U1.2 | length 18.6
  Top Layer w0.15: J2.19 25.95,55.658 25.854,55.754 24.664,55.754 24.4,55.49 24.4,53.6 26.038,51.962 26.038,47.427 28.565,44.9 U1.2 28.565,42.6 28.165,42.2 v1(27.5,42.2)
P23: J2.23 R4.1 U1.6 | length 9.8
  Top Layer w0.15: J2.23 24.971,54.629 24.971,53.739 26.51,52.2 29.11,52.2 29.835,51.475 U1.6 29.835,49.135 v1(29.3,48.6)
PGM_SEL_0: J2.52 J2.67 | length 9.1
  Top Layer w0.15: J2.67 13.95,57.104 17.7,60.854 J2.52
PGM_SEL_1: J2.50 J2.69 | length 9.9
  Top Layer w0.15: v1(13.346,56.1) 13.346,56.019 13.45,55.915 J2.69 ; v1(14.6,56.9) 18.2,60.5 J2.50
  Bottom Layer w0.15: v1(13.346,56.1) 13.8,56.1 v1@14.563,56.863
  Bottom Layer w0.2: v1@14.563,56.863 v1(14.6,56.9)
PGM_SEL_SW_0: J2.58 P1.2 R17.2 SW2.2 | length 38.2
  Top Layer w0.2: v1(16.175,65.509) 16.2,65.485 J2.58 ; SW2.2 28.72,84.66 P1.2
  Bottom Layer w0.2: v1(16.175,65.509) 16.175,78.955 24.828,87.608 SW2.2@25.448,87.608 ; SW2.2 27.493,87.77 27.994,88.271 27.994,88.294 28.4,88.7 R17.2
PGM_SEL_SW_1: J2.56 P1.1 R16.2 SW2.1 | length 37
  Top Layer w0.2: J2.56 16.7,65.159 16.93,65.389 v1(16.93,65.47) ; SW2.1 25.82,85.02 25.82,84.66 28.48,82 28.48,81.36 P1.1
  Bottom Layer w0.2: v1(16.93,65.47) 16.93,65.532 16.725,65.737 16.725,78.705 23.25,85.23 SW2.1 27.23,85.23 27.971,85.971 27.971,85.994 28.377,86.4 R16.2
RV_RST: J2.7 U6.1 | length 19
  Top Layer w0.15: J2.7 28.971,54.629 28.971,53.567 29.388,53.15 30.845,53.15 31.946,52.05 31.946,39.416 30.95,38.42 U6.1
RV_TX: J2.61 U7.3 | length 5.8
  Top Layer w0.15: J2.61 15.45,56.12 15.95,56.62 17.031,56.62 17.271,56.38 v1(17.83,56.38)
  Bottom Layer w0.15: v1(17.83,56.38) 18.544,56.38 18.783,56.619 U7.3
SCK: J1.5 J2.57 | length 40
  Top Layer w0.15: J1.5 11.1,22.7 10.2,23.6 10.2,51.643 10.857,52.3 15.4,52.3 16.45,53.35 J2.57
SDI: J1.3 J2.53 | length 34.7
  Top Layer w0.15: J1.3 13.395,27.864 11.06,27.864 10.8,28.124 10.8,51.276 11.124,51.6 15.549,51.6 17.45,53.501 J2.53
SDO: J1.2 J2.51 | length 31.8
  Top Layer w0.15: J1.2 11.48,30.32 11.1,30.7 11.1,51 11.376,51.276 15.649,51.276 17.95,53.577 J2.51
TX_SEL: J2.75 R2.1 U7.6 | length 10.4
  Top Layer w0.15: J2.75 11.95,57.63 v1(13.025,58.705)
  Bottom Layer w0.15: v1(13.025,58.705) U7.6 16.983,60.404 R2.1
USB_1_N: J4.2 U4.1 | length 2.5
  Bottom Layer w0.35: U4.1 19.914,19.607 19.914,17.186 J4.2
USB_1_P: J4.3 U4.3 | length 5.6
  Bottom Layer w0.35: U4.3 17.978,16.659 19.274,15.363 19.747,15.363 J4.3
USB_2_N: R9.1 U3.6 | length 12.1
  Bottom Layer w0.35: U3.6 19.663,34.637 20.399,33.901 21.243,33.057 22.475,31.825 22.475,28.837 20.095,26.457 20.095,25.853 R9.1
USB_2_P: R10.1 U3.5 | length 11.6
  Bottom Layer w0.35: R10.1 18.2,25.734 18.425,25.959 18.819,25.959 21.925,29.065 21.925,31.597 21.015,32.507 20.155,33.367 U3.5
VSCPU_RST: J2.54 J2.65 | length 11.6
  Top Layer w0.15: v1@13.346,57.313 17.2,61.167 J2.54 ; J2.65 14.45,55.732 14.754,56.037 v1(14.754,56.1)
  Top Layer w0.2: v1(13.346,57.25) v1@13.346,57.313
  Bottom Layer w0.15: v1@13.346,57.276 13.67,57.6 14.754,57.6 15.204,57.15 15.204,56.55 v1(14.754,56.1)
  Bottom Layer w0.2: v1(13.346,57.25) v1@13.346,57.276
VSCPU_RX: J2.71 U7.4 | length 8
  Top Layer w0.15: v1(12.57,57.193) 12.57,56.098 12.95,55.718 J2.71
  Bottom Layer w0.15: v1@12.605,57.228 12.605,57.535 13.152,58.082 15.323,58.082 16.2,57.205 U7.4
  Bottom Layer w0.2: v1(12.57,57.193) v1@12.605,57.228
pads on no net: J2. J2.2 J2.4 J2.6 J2.8 J2.10 J2.20 J2.21 J2.22 J2.32 J2.34 J2.36 J2.38 J2.39 J2.40 J2.41 J2.43 J2.45 J2.47 J2.49 J2.60 J2.62 J2.63 J2.64 J2.66 J2.72 J2.74 J4.5 J4.6 U3.9 U3.10 U3.11 U3.12 U3.13 U3.14 U3.15 U6.3

## Polygon pours and split planes (outlines as drawn)
GND on Top Layer "NONET_L-01_P-001" (solid, pour order 0): 9.9,10 32.4,10 32.4,90 9.9,90
GND on Bottom Layer "NONET_L-01_P-001" (solid, pour order 1): 9.9,10 32.4,10 32.4,90 9.9,90

## Keep-outs
Top Layer:
  region: 24.15,63.25 24.171,63.229 24.963,63.229 24.963,61.28 24.964,61.278 26.995,61.278 26.995,60.344 26.951,60.28 24.163,60.28

## Silkscreen, mask and mechanical layers (free items; w line width, h text height)
Top Overlay:
  text "SW_0" at 31.746,88.746 h1.2 r180
  text "SW_1" at 31.546,86.346 h1.2 r180
  text "1" at 10.654,84.046 h1.2 r270
  text "20" at 31.846,82.034 h1.2 r90
  text "2" at 10.668,81.829 h1.2 r270
  text "19" at 31.846,79.334 h1.2 r90
  text "3" at 10.668,79.213 h1.2 r270
  text "4" at 10.668,76.596 h1.2 r270
  text "5" at 10.668,73.979 h1.2 r270
  text "6" at 10.668,71.363 h1.2 r270
  text "7" at 10.668,68.746 h1.2 r270
  text "e" at 15.309,67.1 h18
  text "8" at 10.668,66.13 h1.2 r270
  text "RST" at 27.054,41.516 h1.2 r270
  text "9" at 10.654,33.346 h1.2 r270
  text "10" at 10.654,31.56 h1.2 r270
  text "PWR" at 28.954,29.346 h1.2 r270
  text "11" at 10.654,28.774 h1.2 r270
  text "12" at 10.654,26.389 h1.2 r270
  text "13" at 10.654,23.603 h1.2 r270
  text "18" at 31.846,21.646 h1.2 r90
  text "14" at 10.654,20.817 h1.2 r270
  text "17" at 31.846,19.089 h1.2 r90
  text "15" at 10.654,18.032 h1.2 r270
  text "16" at 10.654,15.246 h1.2 r270
  text "o" at 35.1,14.3 h10 r90
Bottom Overlay:
  lines w0.37: 18.205,73.871 18.346,73.446 ; 18.771,73.305 18.346,73.446 ; 19.054,74.154 18.346,73.446
  text "3V3" at 23.246,88.279 h1.2
  text "IN_1" at 23.246,86.133 h1.2
  text "IN_0" at 23.246,83.986 h1.2
  text "OUT_0" at 23.246,81.84 h1.2
  text "OUT_1" at 23.246,79.693 h1.2
  text "SW_0" at 31.446,77.754 h1.2
  text "OUT_2" at 23.246,77.547 h1.2
  text "SW_1" at 31.446,75.854 h1.2
  text "OUT_3" at 23.246,75.401 h1.2
  text "GND" at 23.246,73.454 h1.2
  text "Designed by  / Ebubekir Tasci" at 10.22,40.4 h1.2 r270
  text "GND" at 30.319,24.754 h1.2
  text "5V" at 29.72,16.754 h1.2

## Text inside footprints (layer, text, board x,y; h text height)
SW2: Top Overlay "ON" at 20.8,85.6 h1.2 r90; Top Component Outline "1" at 24.6,85 h1.2 r90; Top Component Outline "ON" at 20,84.43 h1.2 r90; Top Component Outline "2" at 24.6,87.4 h1.2 r90